# EAGLE board BJT CE Amplifier (EAGLE 9.7.0)

Size 134.89 x 50.17 mm. Coordinates in mm from the lower left corner, seen from the top.
Outline: 0,0 134.89,0 134.89,50.17 0,50.17 0,0
Copper layers (1*16): Top 0.035mm / dielectric 1.5mm / Bottom 0.035mm
Design rules "default": minimum track width 6mil, minimum drill 0.35mm, track to track 6mil, track to pad 6mil, pad to pad 6mil, via to via 6mil, smd to smd 6mil, copper to edge 40mil, drill to drill 6mil, minimum pad ring 10mil, minimum via ring 8mil, stop-mask expansion 4mil, vias tented up to drill 0mil, thermal gap 10mil

## Footprints (pad centres in the part's own frame; a part is rotated, then mirrored left to right if it is on the bottom)
CAP-THRU-2.54MM = drill 1.016 pad 1.88: 1 -1.27,0; 2 1.27,0
BATTERY-GENERIC = drill 1.118 pad 3.15 octagon: + 2.54,0; - -2.54,0
RESAD1016W63L850D250B = drill 0.83 pad 1.43: 1 -5.08,0; 2 5.08,0
TO92 = drill 0.813 octagon: 1 -1.27,0; 2 0,1.905; 3 1.27,0

## Placement (x,y rotation side)
C1  100n  [CAP-THRU-2.54MM]  81.57,16.59 0 top
C2  1000n  [CAP-THRU-2.54MM]  117.13,21.67 0 top
C3  100n  [CAP-THRU-2.54MM]  127.29,19.13 0 top
FUNC1  FUNCTION-GENERATOR  [BATTERY-GENERIC]  8.26,8.5 180 top
P1  BATTERYGENERIC  [BATTERY-GENERIC]  45.48,41.91 180 top
R1  170k  [RESAD1016W63L850D250B]  98.08,19.13 180 top
R2  10k  [RESAD1016W63L850D250B]  95.54,21.67 0 top
R3  100  [RESAD1016W63L850D250B]  108.24,16.59 180 top
R4  10k  [RESAD1016W63L850D250B]  105.7,8.97 90 top
R6  10k  [RESAD1016W63L850D250B]  128.56,8.97 90 top
T1  NPN  [TO92]  103.16,24.21 0 top

## Library data of the parts
C1-C3 FUNC1 P1 R1-R4 R6 = Tinkercad
T1 = Tinkercad; CATEGORY: Transistor; SUB-CATEGORY: BJT; TYPE: NPN

## Nets
FUNC1+: C1.1 FUNC1.+
P1+: P1.+ R1.2 R2.1
P1-: C2.2 FUNC1.- P1.- R3.1 R4.1 R6.1
R6_2: C3.2 R6.2
T1_B: C1.2 R1.1 R3.2 T1.2
T1_C: C3.1 R2.2 T1.1
T1_E: C2.1 R4.2 T1.3

## Tracks (layer width: path | path; a pad name or v marks a point on that pad's centre or on a via)
FUNC1+  (1 unrouted)
P1+  (2 unrouted)
P1-  (5 unrouted)
R6_2  (1 unrouted)
T1_B  (3 unrouted)
T1_C  (2 unrouted)
T1_E  (2 unrouted)